# Altium PCB Side.PcbDoc
Units mm, origin at the board's own origin, x right, y up, seen from the top; angles counter-clockwise.
Board outline 51.4 x 115 mm, 2 copper layers (Top Layer, Bottom Layer); 88 components, 69 nets, 305 pads, 423 vias.
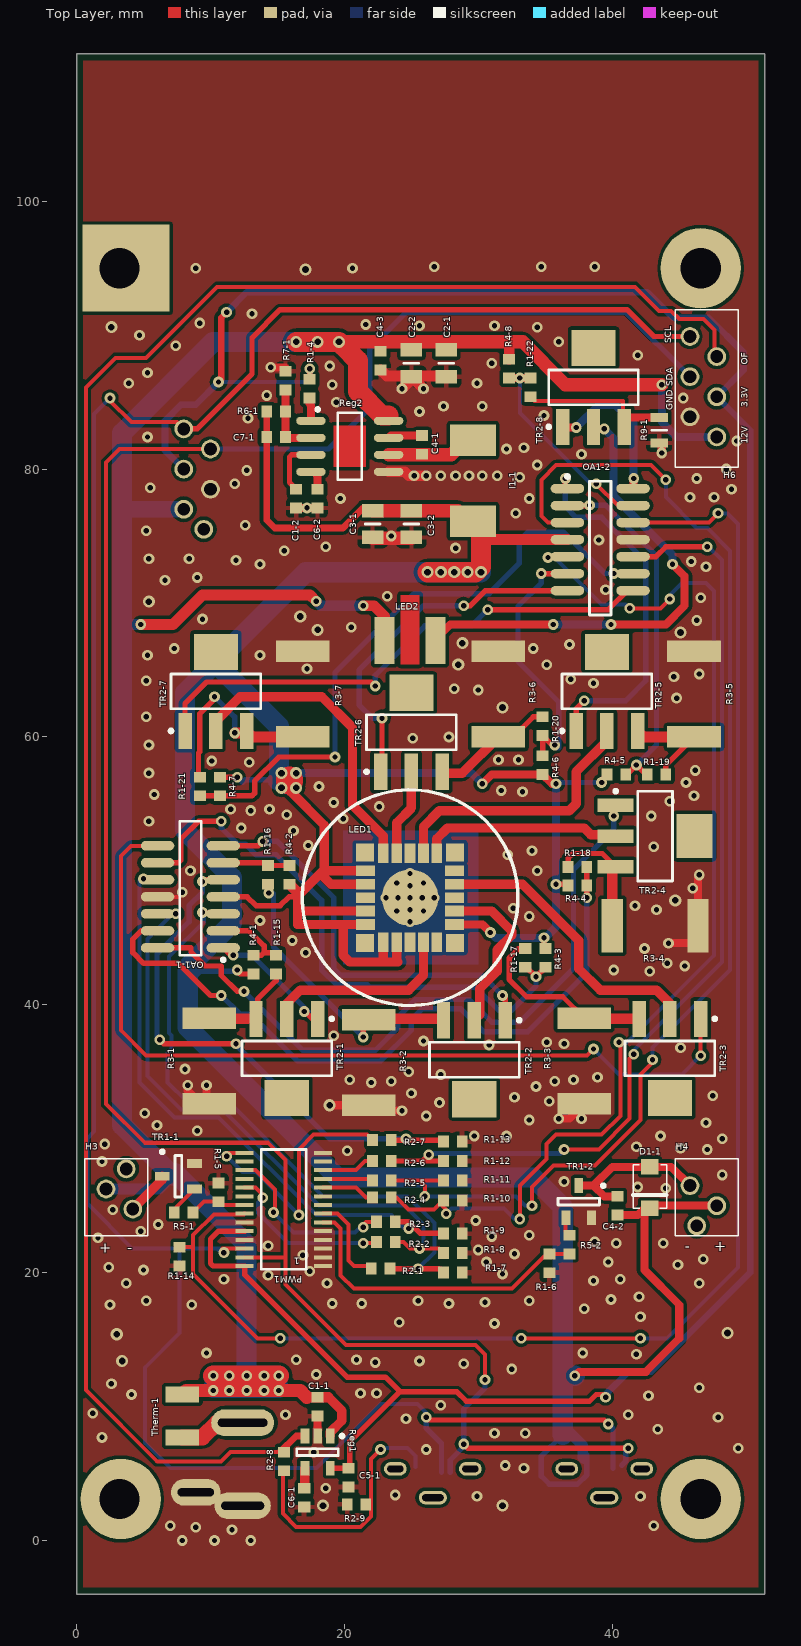
[diagram p0: Top Layer view]
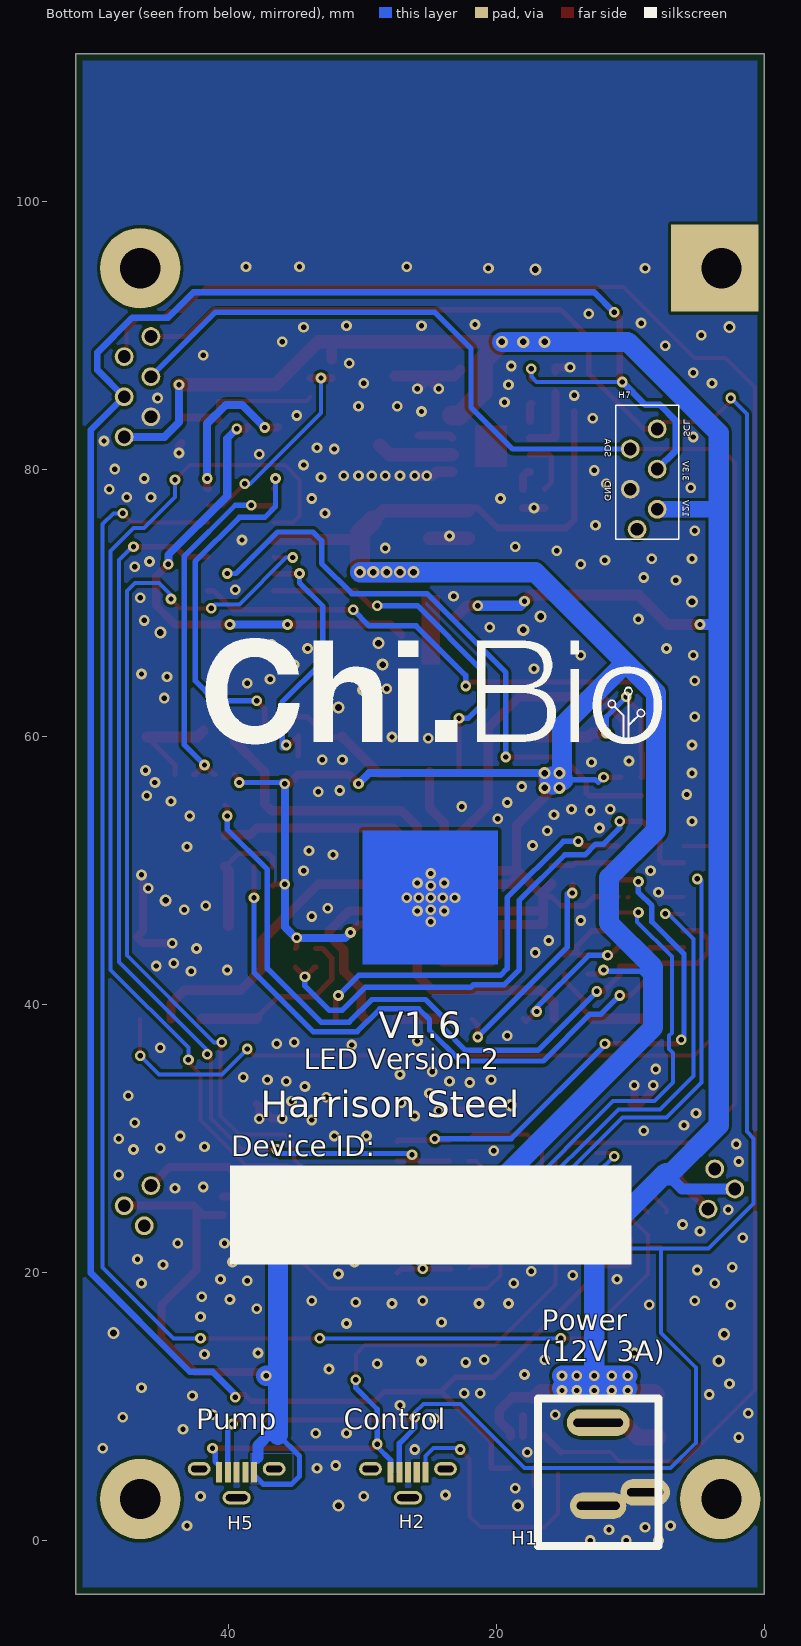
[diagram p1: Bottom Layer view, seen from below]

## Layer stack, top to bottom
Top Solder: solder mask 0.0102, Solder Resist, Dk 3.5
Top Layer: signal copper 0.0356
Dielectric 1: dielectric 0.32, FR-4, Dk 4.8
Bottom Layer: signal copper 0.0356
Bottom Solder: solder mask 0.0102, Solder Resist, Dk 3.5

## Board outline
0,-4 51.4,-4 51.4,111 0,111

## Design rules (kind name [scope] priority, off if disabled: settings)
BoardOutlineClearance [All] p1: gap=0.5 ignorepadtopadclearanceinfootprint=FALSE
Clearance [All] p1: gap=0.25 ignorepadtopadclearanceinfootprint=FALSE
HoleSize [All] p1: absolutevalues=TRUE maxlimit=50 minlimit=0.025 maxpercent=80.000 minpercent=20.000
MinimumSolderMaskSliver [All] p1: minsoldermaskwidth=0.1
PlaneConnect [All] p1: planeconnectstyle=Direct reliefexpansion=0.508 reliefentries=4 reliefconductorwidth=0.254 reliefairgap=0.254
PolygonConnect PolygonConnect_1 [All vs HasFootprint('1608[0603]')] p1: thpad.connectstyle=Relief thpad.reliefconductorwidth=0.35 thpad.reliefentries=4 thpad.polygonreliefangle="90 Angle" thpad.airgapwidth=0.3 smdpad.connectstyle=Relief smdpad.reliefconductorwidth=0.35 smdpad.reliefentries=4 smdpad.polygonreliefangle="90 Angle" smdpad.airgapwidth=0.3 via.connectstyle=Direct via.reliefconductorwidth=0.35 via.reliefentries=4 via.polygonreliefangle="90 Angle" via.airgapwidth=0.3
PolygonConnect PolygonConnect_3 [All vs HasFootprint('0805')] p2: connectstyle=Relief reliefconductorwidth=0.35 reliefentries=4 polygonreliefangle="90 Angle" airgapwidth=0.3
PolygonConnect PolygonConnect_2 [All vs HasFootprint('0805Large')] p3: connectstyle=Relief reliefconductorwidth=0.35 reliefentries=4 polygonreliefangle="90 Angle" airgapwidth=0.3
PolygonConnect [All] p4: connectstyle=Direct reliefconductorwidth=0.254 reliefentries=4 polygonreliefangle="90 Angle" airgapwidth=0.254
RoutingVias [All] p1: holewidth=0.4 width=0.8 viastyle="Through Hole" minholewidth=0.4 minwidth=0.8 maxholewidth=1.5 maxwidth=2
SilkToSilkClearance [All] p1: silktosilkclearance=0
SilkToSolderMaskClearance [IsPad] p1: minsilkscreentomaskgap=0 clearancetoexposedcopper=TRUE
SolderMaskExpansion [All] p1: expansion=0.102
Width [All] p1: maxlimit=2 minlimit=0.254 preferedwidth=0.254 minimp=50.000000 maximp=50.000000 favimp=50.000000
25 further rules are at their usual default settings.

## Components (designator, comment, footprint, x,y, rotation, side; value= is the part's Value field where it differs from the comment)
C1-1 "1 uF" 1608[0603] 18,10 r270 top
C1-2 "1 uF" 1608[0603] 16.4,77.8 r270 top
C2-1 "10 uF" 0805Large 27.6,87.9 r90 top
C2-2 "10 uF" 0805Large 25,87.9 r90 top
C3-1 "22 uF" 0805Large 22.1,75.9 r90 top
C3-2 "22 uF" 0805Large 25,75.9 r90 top
C4-1 "0.1 uF" 1608[0603] 25.8,81.8 r90 top
C4-2 "0.1 uF" 1608[0603] 40.4,25 r90 top
C4-3 "0.1 uF" 1608[0603] 22.7,88.1 r270 top
C5-1 "4.7uF" 1608[0603] 20.3,4.7 r270 top
C6-1 "0.01uF" 1608[0603] 17,3.2 r90 top
C6-2 "0.01uF" 1608[0603] 18,77.8 r270 top
C7-1 "22pF" 1608[0603] 14.9,82.4 r180 top
D1-1 "D1" "SOD 123" 42.8,24.8 r90 top
H1 "Power (12V 3A)" PowerJack1 12.4,3.6 r180 bottom
H2 "Control" "Micro USB" 26.6,5.35 r180 bottom
H3 "Heat" InterCon2 3.7,27.748 r270 top
H4 "Stir" InterCon2 46.3,23.5 r90 top
H5 "Pump" "Micro USB" 39.4,5.35 r180 bottom
H6 "Measurement" "Inter Connect 6 - reduced" 46.3,80.9 r90 top
H7 "Expansion" "Inter Connect 5" 9.5,75.5 r90 bottom
I1-1 "3.3uH" INDUCTOR2 29.6,81.9 r270 top
LED1 "LEDEngin_V2" LEDENGIN 24.9,48 r0 top
LED2 "LED UV" "UV LED" 24.9,67.2 r0 top
OA1-1 "OpAmp 4Way" SOIC14_M 8.5,48.7 r180 top
OA1-2 "OpAmp 4Way" SOIC14_M 39.1,74.1 r0 top
PWM1 "PWM28" TSSOP-28 18.4,20.5 r180 top
R1-4 "10k" 1608[0603] 17.4,86 r270 top
R1-5 "10k" 1608[0603] 10.6,26 r270 top
R1-6 "10k" 1608[0603] 35.3,20.7 r90 top
R1-7 "10k" 1608[0603] 28.1,20 r180 top
R1-8 "10k" 1608[0603] 28.1,21.467 r180 top
R1-9 "10k" 1608[0603] 28.1,22.933 r180 top
R1-10 "10k" 1608[0603] 28.1,25.4 r180 top
R1-11 "10k" 1608[0603] 28.1,26.867 r180 top
R1-12 "10k" 1608[0603] 28.1,28.333 r180 top
R1-13 "10k" 1608[0603] 28.1,29.8 r180 top
R1-14 "10k" 1608[0603] 7.7,21.2 r90 top
R1-15 "10k" 1608[0603] 14.9,43 r270 top
R1-16 "10k" 1608[0603] 14.3,49.7 r270 top
R1-17 "10k" 1608[0603] 33.5,43.5 r90 top
R1-18 "10k" 1608[0603] 37.4,50.3 r180 top
R1-19 "10k" 1608[0603] 43.3,57.2 r0 top
R1-20 "10k" 1608[0603] 34.8,60.8 r90 top
R1-21 "10k" 1608[0603] 9.2,56.3 r90 top
R1-22 "10k" 1608[0603] 33.9,86.1 r90 top
R2-1 "38.3k" 1608[0603] 22.7,20.3 r180 top
R2-2 "38.3k" 1608[0603] 23.1,22.3 r180 top
R2-3 "38.3k" 1608[0603] 23.1,23.8 r180 top
R2-4 "38.3k" 1608[0603] 22.8,25.6 r180 top
R2-5 "38.3k" 1608[0603] 22.8,26.867 r180 top
R2-6 "38.3k" 1608[0603] 22.8,28.333 r180 top
R2-7 "38.3k" 1608[0603] 22.8,29.9 r180 top
R2-8 "38.3k" 1608[0603] 15.5,5.9 r90 top
R2-9 "38.3k" 1608[0603] 20.9,2.7 r0 top
R3-1 "1" 2512 9.9,35.8 r270 top
R3-2 "1" 2512 21.8,35.7 r270 top
R3-3 "1" 2512 37.9,35.8 r270 top
R3-4 "1" 2512 43.2,45.9 r0 top
R3-5 "1" 2512 46.098,63.2 r90 top
R3-6 "1" 2512 31.498,63.2 r90 top
R3-7 "1" 2512 16.898,63.2 r90 top
R4-1 "1M" 1608[0603] 13.2,43 r90 top
R4-2 "1M" 1608[0603] 15.9,49.7 r90 top
R4-3 "1M" 1608[0603] 35,43.5 r270 top
R4-4 "1M" 1608[0603] 37.4,48.9 r0 top
R4-5 "1M" 1608[0603] 40.3,57.2 r0 top
R4-6 "1M" 1608[0603] 34.8,57.9 r90 top
R4-7 "1M" 1608[0603] 10.7,56.3 r270 top
R4-8 "1M" 1608[0603] 32.3,87.5 r270 top
R5-1 "4.99" 1608[0603] 8,24.5 r180 top
R5-2 "4.99" 1608[0603] 36.8,22.1 r90 top
R6-1 "152k" 1608[0603] 14.9,84.3 r0 top
R7-1 "22.1k" 1608[0603] 15.6,86.6 r270 top
R9-1 "40.2" 0805 43.5,82.9 r90 top
Reg1 "3.3V Regulator" SOT23-5 18,6.6 r270 top
Reg2 "6V Regulator" "8-SOIC V3" 20.4,81.7 r0 top
Therm-1 "10" 1206 7.9,7.7 r90 top
TR1-1 "MOSFET" SOT23-3 7.6,27.2 r0 top
TR1-2 "MOSFET" SOT23-3 37.5,25.3 r270 top
TR2-1 "TransistorPower2" SOT223_M 15.7,36 r270 top
TR2-2 "TransistorPower2" SOT223_M 29.7,35.9 r270 top
TR2-3 "TransistorPower2" SOT223_M 44.3,36 r270 top
TR2-4 "TransistorPower2" SOT223_M 43.2,52.6 r0 top
TR2-5 "TransistorPower2" SOT223_M 39.6,63.4 r90 top
TR2-6 "TransistorPower2" SOT223_M 25,60.35 r90 top
TR2-7 "TransistorPower2" SOT223_M 10.4,63.4 r90 top
TR2-8 "TransistorPower2" SOT223_M 38.6,86.1 r90 top

## Footprints (in the part's own frame and the unit in brackets; to place one, negate y for a bottom-side part, rotate by r counter-clockwise, add the part's x,y. Pads: shape width x height; smd on the part's side, far side on the other; paste and mask are expansions set on the pad)
"8-SOIC V3" [mm] "SOIC, 8-Leads, Body 4.9x3.9mm, Pitch 1.27mm, IPC Medium Density"
  oval 2.2x0.6 smd: 1(-2.9,1.905) 2(-2.9,0.635) 3(-2.9,-0.635) 4(-2.9,-1.905) 5(2.9,-1.905) 6(2.9,-0.635) 7(2.9,0.635) 8(2.9,1.905)
  Top Layer region: -1.2,-1.55 1.2,-1.55 1.2,1.55 -1.2,1.55
  silkscreen extent -2.52,-2.5 0.9,2.88, body extent -2,-2.5 2,2.5, height 1.75
0805 [mm] "Chip Resistor, Body 2.0x1.2mm, IPC High Density"
  rect 0.7x1.3 smd: 1(-0.95,0) 2(0.95,0)
  silkscreen extent 0,-0.55 0,0.55, body extent -1.07,-0.7 1.07,0.7, height 0.7
0805Large [mm] "Chip Resistor, Body 2.0x1.2mm, IPC High Density"
  rect 1x1.6 smd: 1(-1,0) 2(1,0)
  silkscreen extent 0,-0.55 0,0.55, body extent -1.07,-0.7 1.07,0.7, height 0.7
1206 [mm]
  rect 1.2x2.5 smd: 1(0,0) 2(3.2,0)
1608[0603] [mm] "Chip Capacitor, Body 1.6x0.8mm, IPC High Density"
  rect 0.8x0.9 smd: 1(-0.7,0) 2(0.7,0)
  body extent -0.87,-0.48 0.87,0.48, height 1.3
2512 [mm] "Chip Inductor, Body 2.0x1.2mm, IPC High Density"
  rect 1.6x4 smd: 1(3.2,0) 2(-3.2,0)
  body extent -1.1,-0.7 1.1,0.7, height 0.55
INDUCTOR2 [mm] "Chip Inductor, Body 2.0x1.2mm, IPC High Density"
  rect 2.35x3.4 smd: 1(-0.25,0) 2(5.8,0)
"Inter Connect 5" [mm]
  round 1.4 hole 0.95: 0(0,0) 1(1.5,-1.5) 2(3,0.5) 3(4.5,-1.5) 4(6,0.5) 5(7.5,-1.5)
  silkscreen extent -0.75,-3.1 9.25,1.6
"Inter Connect 6 - reduced" [mm]
  round 1.4 hole 0.95: 1(1.5,-1.5) 2(3,0.5) 3(4.5,-1.5) 4(6,0.5) 5(7.5,-1.5) 6(9,0.5)
  silkscreen extent -0.75,-3.1 11,1.6
InterCon2 [mm]
  round 1.4 hole 0.95: 0(0,0) 1(1.5,-1.5) 2(3,0.5)
  silkscreen extent -0.75,-3.1 5,1.6
LEDENGIN [mm]
  rect 1.35x1.35 smd: 1(-3.37,3.37) 7(-3.37,-3.37) 13(3.37,-3.37) 19(3.37,3.37)
  rect 1.44x0.8 smd: 2(-3.325,2) 3(-3.325,1) 4(-3.325,0) 5(-3.325,-1) 6(-3.325,-2) 14(3.325,-2) 15(3.325,-1) 16(3.325,0) 17(3.325,1) 18(3.325,2)
  rect 0.8x1.44 smd: 8(-2,-3.325) 9(-1,-3.325) 10(0,-3.325) 11(1,-3.325) 12(2,-3.325) 20(2,3.325) 21(1,3.325) 22(0,3.325) 23(-1,3.325) 24(-2,3.325)
  round 4.22 smd: 25(0,0)
  round 0.2 on Top Overlay: 25_1(-4.6,3)
"Micro USB" [mm]
  oval 2.1x1 hole 0.5 slot 1.6 at 0 deg: 0(0,-2.15)
  oval 1.7x1 hole 0.5 slot 1.2 at 0 deg: 0_1(2.8,0) 0_2(-2.8,0)
  rect 0.45x1.5 smd: 1(-1.3,-0.25) 2(-0.65,-0.25) 3(0,-0.25) 4(0.65,-0.25) 5(1.3,-0.25)
PowerJack1 [mm]
  oval 4.7x2 hole 0.6 slot 3.7 at 0 deg: 1(0,5.2)
  oval 4.2x2 hole 0.6 slot 3.2 at 0 deg: 2(0,-1)
  oval 3.7x2 hole 0.6 slot 2.7 at 0 deg: 3(3.5,0)
  silkscreen extent -4.5,-4 4.5,7
"SOD 123" [mm]
  rect 1.15x1.3 smd: 1(0,0) 2(3.1,0)
  silkscreen extent 0,-1.25 3.25,1.25
SOIC14_M [mm] "SOIC, 16-Leads, Body 9.9x3.9mm, Pitch 1.27mm, IPC Low Density"
  oval 2.5x0.7 smd: 1(-2.45,4.445) 2(-2.45,3.175) 3(-2.45,1.905) 4(-2.45,0.635) 5(-2.45,-0.635) 6(-2.45,-1.905) 7(-2.45,-3.175) 8(2.45,-3.175) 9(2.45,-1.905) 10(2.45,-0.635) 11(2.45,0.635) 12(2.45,1.905) 13(2.45,3.175) 14(2.45,4.445)
  silkscreen extent -2.58,-5 0.8,5.47, body extent -2,-5 2,5, height 1.91
SOT23-3 [mm] "SOT23, 6-Leads, Body 2.9x1.6mm, Pitch 0.95mm, Lead Span 2.7mm, IPC Medium Density"
  rect 1.1x0.65 smd: 1(1.2,-0.95) 2(1.2,0.95) 3(-1.2,0)
  silkscreen extent -1.32,-1.55 0.25,1.95, body extent -0.9,-1.55 0.9,1.55, height 1.45
SOT23-5 [mm] "SOT23, 6-Leads, Body 2.9x1.6mm, Pitch 0.95mm, Lead Span 2.7mm, IPC Medium Density"
  rect 1.1x0.65 smd: 1(-1.2,0.95) 2(-1.2,0) 3(-1.2,-0.95) 4(1.2,-0.95) 5(1.2,0.95)
  silkscreen extent -1.32,-1.55 0.25,1.95, body extent -0.9,-1.55 0.9,1.55, height 1.45
SOT223_M [mm] "SOT223, 4-Leads, Body 6.5x3.5mm, Pitch 2.3mm, Lead Span 7mm, IPC Low Density"
  rect 2.7x1 smd: 1(-2.95,2.3) 2(-2.95,0) 3(-2.95,-2.3)
  rect 2.7x3.3 smd: 4(2.95,0)
  silkscreen extent -3.07,-3.35 1.3,3.48, body extent -1.85,-3.35 1.85,3.35, height 1.7
TSSOP-28 [mm]
  rect 1.35x0.3 smd: 1(0,0) 2(0,-0.65) 3(0,-1.3) 4(0,-1.95) 5(0,-2.6) 6(0,-3.25) 7(0,-3.9) 8(0,-4.55) 9(0,-5.2) 10(0,-5.85) 11(0,-6.5) 12(0,-7.15) 13(0,-7.8) 14(0,-8.45) 15(5.85,-8.45) 16(5.85,-7.8) 17(5.85,-7.15) 18(5.85,-6.5) 19(5.85,-5.85) 20(5.85,-5.2) 21(5.85,-4.55) 22(5.85,-3.9) 23(5.85,-3.25) 24(5.85,-2.6) 25(5.85,-1.95) 26(5.85,-1.3) 27(5.85,-0.65) 28(5.85,0)
  silkscreen extent 1.25,-8.7 4.6,0.25
"UV LED" [mm]
  rect 1.5x3.5 smd: 1(1.9,0) 2(-1.9,0)
  round 0.3 on Top Overlay: 3(-1.85,2.15)

## Part data
C1-1 C1-2 C4-1 C4-2 C4-3 C5-1 C6-1 C6-2: library part Cap, "Capacitor", FP="0603 (1608 Metric)"
  C1-1 C1-2: Digikey P/N=1276-1019-1-ND
  C4-1 C4-2 C4-3: Digikey P/N=311-1341-1-ND
  C5-1: Digikey P/N=1276-1044-1-ND
  C6-1 C6-2: Digikey P/N=445-5662-1-ND
C2-1 C2-2 C3-1 C3-2: library part "Cap 0805", "Capacitor", FP="0805 (2012 Metric)"
  C2-1 C2-2: Digikey P/N=587-1295-1-ND
  C3-1 C3-2: Digikey P/N=1276-6780-1-ND
C7-1: library part Cap, "Capacitor C0G,NP0", Digikey P/N=311-1755-1-ND, FP="0603 (1608 Metric)"
D1-1: library part Diode, "Diode", DigiKey=https://www.digikey.co.uk/products/en?keywords=1655-1928-1-ND, Digikey P/N=1655-1928-1-ND, FP=SOD-123
H1: library part PowerJack1, "Power Connector", DigiKey=https://www.digikey.co.uk/product-detail/en/cui-inc/PJ-044AH/CP-044AH-ND/1644569, Digikey P/N=CP-044AH-ND, FP="PWR Jack"
H2 H5: library part MicroUSB, "MicroUSB Connector", Digikey P/N=WM10134CT-ND, DK=https://www.digikey.co.uk/product-detail/en/molex-llc/1051330001/WM9734CT-ND/4037910, FP="MicroUSB Female"
H3 H4: library part "Interconnect 2", "2 Position Connector", Digikey P/N=A98681-ND, DK=https://www.digikey.co.uk/product-detail/en/te-connectivity-amp-connectors/292207-2/A98681-ND/1855351, FP="Mini CT 2POS"
H6: library part "Interconnect 6", "6 Wire", Digikey P/N=A100196-ND, DK=https://www.digikey.co.uk/product-detail/en/te-connectivity-amp-connectors/292207-6/A98685-ND/1855355, FP="Connecting Wire"
H7: library part "Interconnect 5", "5 Position Connector", Digikey P/N=A98684-ND, DK=https://www.digikey.co.uk/product-detail/en/te-connectivity-amp-connectors/292207-5/A98684-ND/1855354, FP="Mini CT 5POS"
I1-1: library part Inductor2, "Inductor", Digikey P/N=445-4119-1-ND, DK=https://www.digikey.co.uk/product-detail/en/tdk-corporation/SPM6530T-3R3M/445-4119-1-ND/1993657, FP="Wirewound Inductor"
OA1-1 OA1-2: "OpAmp", Digikey P/N=AD8534ARZ-REELCT-ND, DK=https://www.digikey.co.uk/product-detail/en/analog-devices-inc/AD8534ARZ-REEL/AD8534ARZ-REELCT-ND/3771270, FP=14-SOIC
PWM1: "PWM", Digikey P/N=568-11925-1-ND, DK=https://www.digikey.co.uk/product-detail/en/nxp-usa-inc/PCA9685PW118/568-11925-1-ND/5221902, FP=28-TSSOP
R1-4 R1-5 R1-6 R1-7 R1-8 R1-9 R1-10 R1-11 R1-12 R1-13 R1-14 R1-15 R1-16 R1-17 R1-18 R1-19 R1-20 R1-21 R1-22 R2-1 R2-2 R2-3 R2-4 R2-5 R2-6 R2-7 R2-8 R2-9 R4-1 R4-2 R4-3 R4-4 R4-5 R4-6 R4-7 R4-8 R5-1 R5-2 R6-1 R7-1: library part Res1, "Resistor", FP="0603 (1608 Metric)"
  R1-4 R1-5 R1-6 R1-7 R1-8 R1-9 R1-10 R1-11 R1-12 R1-13 R1-14 R1-15 R1-16 R1-17 R1-18 R1-19 R1-20 R1-21 R1-22: Digikey P/N=311-10.0KHRCT-ND
  R2-1 R2-2 R2-3 R2-4 R2-5 R2-6 R2-7 R2-8 R2-9: Digikey P/N=311-38.3KHRCT-ND
  R4-1 R4-2 R4-3 R4-4 R4-5 R4-6 R4-7 R4-8: Digikey P/N=RMCF0603FG1M00CT-ND
  R5-1 R5-2: Digikey P/N=311-4.99HRCT-ND
  R6-1: DigiKey=https://www.digikey.co.uk/product-detail/en/yageo/RT0603DRE07152KL/311-2096-1-ND/6128515, Digikey P/N=311-2096-1-ND
  R7-1: Digikey P/N=311-2486-1-ND
R3-1 R3-2 R3-3 R3-4 R3-5 R3-6 R3-7 R9-1: library part Res2, "Resistor"
  R3-1 R3-2 R3-3 R3-4 R3-5 R3-6 R3-7: Digikey P/N=A109718CT-ND, FP="2512 (6432 Metric)"
  R9-1: DigiKey=https://www.digikey.co.uk/product-detail/en/stackpole-electronics-inc/RMCF2512FT49R9/RMCF2512FT49R9CT-ND/6052990, Digikey P/N=P16072CT-ND, FP="0805 (2012 Metric)"
Reg1: library part "4V Regulator", DigiKey=https://www.digikey.co.uk/product-detail/en/texas-instruments/LP2985-33DBVR/296-18476-1-ND/809911, Digikey P/N=296-18476-1-ND, FP=SOT-23-5
Reg2: library part "VRegulator V2", DigiKey=https://www.digikey.co.uk/product-detail/en/texas-instruments/TPS54427DDAR/296-30033-1-ND/2795678, Digikey P/N=296-30033-1-ND, FP=8-SOIC
Therm-1: library part Res1, "Thermistor", DigiKey=https://www.digikey.com/en/products/detail/NC20KC0100KBA/478-NC20KC0100KBACT-ND/12760761, Digikey P/N=478-NC20KC0100KBACT-ND, FP="1206 (3216 Metric)"
TR1-1 TR1-2: library part "Heater MOSFET", "Transistor", DigiKey=https://www.digikey.co.uk/product-detail/en/alpha-omega-semiconductor-inc/AO3420/785-1014-1-ND/1855956, Digikey P/N=785-1014-1-ND, FP=SOT-23-3
TR2-1 TR2-2 TR2-3 TR2-4 TR2-5 TR2-6 TR2-7 TR2-8: "Transistor", DigiKey=https://www.digikey.co.uk/product-detail/en/diodes-incorporated/ZXTN25100DGTA/ZXTN25100DGCT-ND/1873984, Digikey P/N=ZXTN25100DGCT-ND, FP=SOT-223
LED1: Digikey P/N=LZ7-04M2PD-0000_G2
LED2: DigiKey=https://www.digikey.co.uk/products/en?keywords=RVXR-280-SM-073105, Digikey P/N=1807-1023-2-ND, FP="XR SMD"

## Free pads (board coordinates)
  round 6 hole 3 copper offset 0.1,0: 3(3.2,3.1)
  rect 6.5x6.5 hole 3 copper offset 0.5,0: 3(3.2,95)
  round 6 hole 3: 3(46.6,3.1) 3(46.6,95)

## Via types
v1: diameter 0.8, hole 0.4, Top Layer to Bottom Layer, tented both sides, 394 vias
v2: diameter 0.9, hole 0.5, Top Layer to Bottom Layer, tented both sides, 28 vias
v3: diameter 0.8, hole 0.4, Top Layer to Bottom Layer, 1 vias

## Nets (pads, with @x,y where several pads share a name; then routed paths per layer and width w, separated by ;. In a path a pad name is that pad's centre, name@x,y a point inside that pad or via, vN(x,y) a via of type N, cw(c..) or ccw(c..) an arc to the next point about the centre after c; other vN are vias at no path point)
3.3V: C5-1.1 H6.3 H7.3 PWM1.24 PWM1.28 R1-4.1 Reg1.5 | length 197.8
  Top Layer w0.4: PWM1.24 10.6,23.1 10,22.5 10,20.7 10.2,20.5 PWM1.28 12.55,19.851 20.201,12.2 23.068,12.2 24.134,11.134 ; R1-4.1 v1(17.4,87.5) ; Reg1.5 C5-1.1 20.4,5.4 20.4,6.8 20.4,7.4 24.1,11.1 28.4,11.1 29.1,10.4 38.3,10.4 38.8,10.9 39.5,10.9 v1(39.5,10.7)
  Top Layer w0.5: v1(10.6,86.5) 10.8,86.7 10.8,91.3 v1(11.2,91.7)
  Bottom Layer w0.3: v1(10.6,86.5) 17,86.5 17.4,86.9 v1(17.4,87.5)
  Bottom Layer w0.4: v1(39.5,10.7) 39.3,10.7 v1@39.5,10.9
  Bottom Layer w0.5: H7.3 6.6,81.4 6.6,83.6 7.8,84.8 8.9,84.8 v1(10.6,86.5) ; v1(11.2,91.7) 12.7,93.2 42.621,93.2 44.521,91.3 47.2,91.3 49.8,88.7 49.8,87.4 H6.3 50.3,82.9 50.3,20 42.9,12.6 41.2,12.6 v1@39.5,10.9
6V: C3-1.2 C3-2.2 C4-2.1 C7-1.2 D1-1.1 H4.1 H5.5 I1-1.2 LED1.2 LED1.3 LED1.5 LED1.6 LED1.8 LED1.9 LED1.14 OA1-1.4 OA1-2.4 R4-1.1 R4-2.1 R4-3.1 R4-4.1 R4-5.1 R4-6.1 R4-7.1 R6-1.1 | length 295.4
  Top Layer w0.3: OA1-1.4@10.15,48.065 OA1-1.4@10.215,48
  Top Layer w0.4: R4-7.1 v1(12,57) ; OA1-1.4 12.735,48.065 13.4,47.4 15.2,47.4 15.865,48.065 16.465,48.065 ; v1(12,42.6) 12,42.5 12.2,42.3 R4-1.1 ; 16.465,48.435 16.465,48.065 ; 16.5,48.1 16.465,48.065 ; v1(34.9,45) 34.9,44.3 R4-3.1 ; v1@35.5,56.5 v1(35.8,56.5) ; v1(35.8,49) 36.6,49 R4-4.1 ; v1(39.2,56.6) 39.1,56.7 R4-5.1
  Top Layer w0.5: R6-1.1 C7-1.2 14.2,76.2 14.8,75.6 19.9,75.6 21.4,77.1 C3-1.2@21.8,77.1
  Top Layer w0.6: LED1.14 30.3,46 v3(30.9,45.4) ; v1(30.3,56.5) 31,57.2 R4-6.1 v1@35.5,56.5 ; v1(37.2,12.3) 37.5,12.6 42.5,12.6 45,15.1 45,17.6 42.4,20.2 D1-1.1@42.4,24.8 ; C4-2.1 41.9,24.3 D1-1.1@42.4,24.8 ; H4.1 42.6,25 D1-1.1@42.4,24.8
  Top Layer w0.7: 16,55.9 18.5,53.4 18.5,50.1 ; LED1.6 19.9,46 ; LED1.5 16.6,47 16.5,47.1 ; LED1.3 19,49 18.2,49.8 ; LED1.2 18.6,50 18.5,50.1 ; LED1.8 22.9,43.3 23,43.2 ; LED1.9 23.9,43.3 24,43.2 23,43.2 ; 16.5,47.1 16.5,46 19.9,46 ; 16.5,47.1 16.5,48.1 18.2,49.8 ; 18.2,49.8 18.5,50.1 ; 19.9,46 19.9,43.7 20.4,43.2 23,43.2
  Top Layer w0.8: R4-2.1 16.465,48.435 ; I1-1.2@30.2,75.2 30.665,74.735 OA1-2.4
  Top Layer w1: C3-1.2 C3-2.2 28.45,76.9 I1-1.2@29,76.35
  Top Layer w1.5: v2(26.2,72.3) v2(27.2,72.3) v2(28.2,72.3) v2(29.2,72.3) 29.8,72.3 30.2,72.7 30.2,75.2 I1-1.2@29.25,76.15
  Top Layer w2: 15.9,56.7 15.9,56.8
  Bottom Layer w0.4: 8.3,41.6 9.2,42.5 11.9,42.5 v1(12,42.6) ; v1(12,57) 12.4,56.6 12.6,56.8 15,56.8 ; v1(35.8,56.5) 36,56.7 36.1,56.6 v1(39.2,56.6) ; 36.3,7.9 34.7,6.3 34.7,4.8 35.3,4.2 37.4,4.2 38.1,4.9 38.1,6.4 37.8,6.7
  Bottom Layer w0.6: v2(16.4,57.3) 29.5,57.3 v1(30.3,56.5) ; v3(30.9,45.4) 31.3,45 v1(34.9,45) ; v1@34.9,44.9 35.8,45.8 v1(35.8,49) v1(35.8,56.5)
  Bottom Layer w0.8: 36.85,8.05 37.8,7.1 37.8,6.7 37.8,6.2 37.9,6.1
  Bottom Layer w1.5: 15,56.8 15.1,56.7 15.1,60.8 10.35,65.55 ; v2(30.2,72.3) v2(29.2,72.3) v2(28.2,72.3) v2(27.2,72.3) v2(26.2,72.3) 17.1,72.3 10.35,65.55 ; 36.3,7.9 36.3,12.3 ; v1(37.2,12.3) 36.3,12.3 ; 10.35,65.55 8.1,63.3 8.1,53 11.6,49.5 11.6,46.1 8.3,42.8 8.3,41.6 8.3,38.3 19.5,27.1 34.1,27.1 36.3,24.9 36.3,12.3
  Bottom Layer w2: 15.8,56.7 15.8,56.8
  other v2: 15.3,56.2 16.4,56.2 15.3,57.3
12VRaw: C1-1.1 C2-1.2 C2-2.2 C4-3.1 H3.1 H6.1 H7.1 LED2.2 R4-8.1 Reg1.1 Reg2.8 Therm-1.2 | length 199.9
  Top Layer w0.7: 18.8,10.7 19.8,9.7 19.8,8.95 18.95,8.1 Reg1.1
  Top Layer w0.8: v1(4.8,68.4) 7.2,68.4 9.4,70.6 11.1,70.6 ; 11.2,70.6 17.428,70.6 v1(17.9,70.128) ; 17.2,10.7 C1-1.1 18.8,10.7 ; v1(21.4,69.8) 22.2,69.8 23,69 ; R4-8.1 32.3,89.5
  Top Layer w1: Therm-1.2 8.2,11.2 v1(10.2,11.2) v1(11.4,11.2) v1(12.7,11.2) v1(14,11.2) v1(15.1,11.2) 16.7,11.2 17.2,10.7 ; v2@19.9,89.2 v2(19.6,89.5) 32.3,89.5 33.3,89.5 36.5,86.3 v1(43.7,86.3)
  Top Layer w1.5: v1(10.2,12.3) v1(11.4,12.3) v1(12.7,12.3) v1(14,12.3) v1(15.1,12.3) ; v2(16.4,89.5) v2(18,89.5) v2(19.6,89.5) ; v2@19.9,89.2 21,88.1 21,85.8 22.8,84 23.3,84
  Bottom Layer w0.6: v1(43.7,86.3) 43.7,83.5 44.8,82.4 H6.1
  Bottom Layer w0.8: H3.1 6.148,26.248 7.15,27.25 ; 3.5,68.4 v1(4.8,68.4) ; 7.2,27.3 7.15,27.25 ; 7.35,27.45 7.3,27.4 7.15,27.25 ; v1(17.9,70.128) 18.228,69.8 v1(21.4,69.8)
  Bottom Layer w1.2: 3.4,76.8 3.6,77 H7.1
  Bottom Layer w1.5: 7.15,27.25 3.4,31 3.4,76.8 3.4,82.7 10.2,89.5 v2(16.4,89.5) v2(18,89.5) v2(19.6,89.5) ; 7.35,27.45 12.7,22.1 v1(12.7,12.3) ; v1@10.2,11.4 v1@12.7,11.4 ; v1(10.2,12.3) v1(11.4,12.3) v1(12.7,12.3) ; v1@15.1,11.4 v1@12.7,11.4 ; v1(15.1,12.3) v1(14,12.3) v1(12.7,12.3) ; v1@12.7,11.4 v1(12.7,12.3)
Blue: LED1.23 TR2-6.2 | length 6.5
  Top Layer w0.7: LED1.23 23.9,53.6 25,54.7 TR2-6.2
Blue0: PWM1.10 R2-4.2 | length 4
  Top Layer w0.3: PWM1.10 20.85,26.35 21.6,25.6 R2-4.2
Blue1: OA1-2.5 R1-10.2 R2-4.1 | length 83.6
  Top Layer w0.3: R2-4.1 23.9,25.6 24.8,24.7 26.7,24.7 R1-10.2@27.15,25.15 ; R1-10.2 R1-10.2@27.15,25.15 ; v1(27.6,24.4) 27.6,24.7 R1-10.2@27.15,25.15 ; v1(33.1,24) 33.1,26.5 35.1,28.5 35.1,29.6 35.8,30.3 39.2,30.3 40.6,31.7 40.6,37.1 v1(40.5,37.2) ; v1(35.2,73.4) 36.385,73.4 36.485,73.3 OA1-2.5 ; v1(41.3,69.6) 43.6,69.6 v1(44.3,70.3)
  Bottom Layer w0.3: v1(27.6,24.4) 28,24.8 31.9,24.8 32.7,24 v1(33.1,24) ; v1(35.2,73.4) 35.7,73.4 39.2,69.9 41,69.9 v1(41.3,69.6) ; v1(40.5,37.2) 41.1,37.2 47.6,43.7 47.6,70.9 47,71.5 45.2,71.5 44.3,70.6 v1(44.3,70.3)
Cyan: LED1.11 TR2-1.2 | length 14.7
  Top Layer w0.7: TR2-1.2 15.7,40.1 16.7,41.1 24.8,41.1 25.9,42.2 LED1.11
Cyan0: PWM1.7 R2-1.2 | length 6.9
  Top Layer w0.3: PWM1.7 19.5,24.4 20.3,23.6 20.3,20.9 20.7,20.5 21.8,20.5 R2-1.2
Cyan1: OA1-1.3 R1-7.2 R2-1.1 | length 47.9
  Top Layer w0.3: v1(9.4,46.9) 10.845,46.9 OA1-1.3
  Top Layer w0.4: R2-1.1 v1(25.5,20.3) 27.1,20.3 R1-7.2
  Bottom Layer w0.3: v1(9.4,46.9) 9.5,46.8 9.5,46.2 6.9,43.6 6.9,37.9 7.1,37.7 7.1,36.7 6.8,36.4 6.8,34.2 8.2,32.8 11.3,32.8 18.4,25.7 24.7,25.7 26.708,23.692 26.708,21.508 v1(25.5,20.3)
Enable: H2.5 R2-8.1 R2-9.2 | length 19.3
  Top Layer w0.3: R2-8.1@15.4,5 15.4,2 16.4,1 21.2,1 22,1.8 22,6.1 v1(22.7,6.8)
  Bottom Layer w0.3: v1(22.7,6.8) 22.8,6.9 24.7,6.9 25.3,6.3 H2.5@25.3,5.5
GND: C1-1.2 C1-2.2 C2-1.1 C2-2.1 C3-1.1 C3-2.1 C4-3.2 C5-1.2 C6-1.1 C6-2.2 H1.2 H1.3 H2.3 H5.3 H6.2 H7.2 OA1-1.11 OA1-2.11 PWM1.1 PWM1.2 PWM1.3 PWM1.4 PWM1.5 PWM1.14 PWM1.23 PWM1.25 R1-5.1 R1-6.1 R1-7.1 R1-8.1 R1-9.1 R1-10.1 R1-11.1 R1-12.1 R1-13.1 R1-14.1 R2-9.1 R3-1.1 R3-2.1 R3-3.1 R3-4.1 R3-5.1 R3-6.1 R3-7.1 R7-1.1 R9-1.1 Reg1.2 Reg2.5 TR1-1.2 TR1-2.2 | length 41.2
  Top Layer w0.3: OA1-1.11 7.565,48.065 v1(7.9,48.4)
  Top Layer w0.6: v1(8.3,34) 8.3,33.6 R3-1.1@9.3,32.6 ; v1(9.7,34) 9.7,33 R3-1.1@9.3,32.6 ; R3-1.1 R3-1.1@9.3,32.6 ; v1(14.5,87.6) 15.6,87.6 R7-1.1 ; C1-2.2 v1(17.2,77.1) C6-2.2 ; Reg1.2 C1-1.2 ; v2(18.9,32.5) R3-2.1 22.2,32.1 v1(24.3,32.1) ; v1(36,31.5) 36.8,31.5 R3-3.1@37.7,32.4 ; v1(37.7,31.5) R3-3.1@37.7,32.4 ; R3-3.1 R3-3.1@37.7,32.4 ; R9-1.1 43.7,81.75 v1(43.7,81.2) ; v1(44.2,44.6) 46.4,44.6 46.85,45.05 46.4,45.5 R3-4.1 46.4,49.6 v1(46.5,49.7)
  Top Layer w0.8: C4-3.2 23.15,86.95 C2-1.1@27.6,86.95 ; Reg2.5 24.505,79.795 24.8,79.5 v1(25.2,79.5) v1(26.1,79.5) ; v1(24.3,86) 25,86.7 C2-2.1 v1(25.9,86)
  Top Layer w1: C3-1.1@22.1,74.85 C3-2.1@25,74.85
  other v1: 7.9,0 10.3,0 13,0 11.6,0.8 8.9,1 7,1.1 43.1,1.1 29.9,3.3 42.1,3.3 23.8,3.4 18.6,3.9 33.4,5.4 32,5.6 17.7,6.6 26.1,6.8 49.4,6.9 1.9,7.7 31.2,8 33.5,8 43.4,8.3 24.6,9.1 47.9,9.2 15.6,9.4 41.2,9.4 1.2,9.5 27.2,10.1 42.7,10.8 4.1,10.9 21.2,11 22.4,11 46.5,11.4 2.6,11.7 17.9,12.4 32.5,12.8 28.9,13.2 22.3,13.3 25.6,13.4 16.4,13.5 20.9,13.5 41.8,13.9 9.7,14 37.8,14 31.2,16.2 24.1,16.3 42.1,16.7 37.9,17.3 2.5,17.6 8.6,17.6 19.1,17.7 21.3,17.7 27.8,17.7 30.5,17.8 5.2,17.9 25.5,17.9 33.8,17.9 39.9,18 42,18.2 3.7,19.2 18.7,19.2 46.5,19.2 38.6,19.4 11,19.5 40.6,19.5 14.3,19.8 31.8,19.9 17.4,20.1 5,20.2 2.4,20.4 44.9,20.6 30.6,20.8 39.7,20.8 46.8,21 16.9,21.3 32.7,21.4 30,21.7 14.3,22 40.3,22.2 43.8,22.2 38.7,22.3 1.6,22.6 31,22.7 33.8,22.8 4.8,23.1 6.1,23.6 29.8,23.9 2.7,24.7 44,26.3 41.9,26.4 36.4,26.8 48.2,27.3 1.9,28.3 20.2,29.1 47.1,29.2 45.1,29.3 41.8,29.4 2.1,29.6 48.2,30 29.7,30.2 32.1,30.2 43.6,30.2 9,30.6 6,31 47,31.2 33.8,31.4 26.1,31.7 5.1,31.9 27.1,32.7 35.3,32.8 32.7,33.1 47.5,33.2 25,33.4 34.3,33.9 22,34.2 23.5,34.3 35.7,34.3 20.4,34.4 37.1,34.4 38.9,34.6 27.2,34.8 24.8,35 8.1,35.2 45.1,36.8 30.8,37 36.4,37.1 35.1,37.2 25.9,37.3 19.2,37.7 42.8,42.5 40.1,42.6 45.4,42.9 44.1,43.1 17.1,43.9 42.4,44.2 16.1,44.8 13.7,46.3 33.8,46.6 43.3,47.1 32.6,47.2 41.7,47.4 46,48.7 8.5,50 34.4,50 32.2,51.2 34,51.5 43.1,51.8 17.3,51.9 16.2,53 12.3,53.2 5.4,53.7 19.9,53.9 42.9,54.1 15.7,54.2 13,54.5 11.5,54.6 14.4,54.6 22.6,54.8 19.2,55.1 44.3,55.2 46.1,55.6 5.8,55.7 33.3,55.9 31.7,56 18.1,56.3 45.5,56.6 5.4,57.3 46.2,57.5 12.9,58.1 10.1,58.2 31.5,58.3 33,58.3 5.4,59.4 25.1,59.9 27.8,60 5.2,61.5 44.8,62.9 30,63.5 28.2,63.6 38.6,64 5.2,64.2 36.9,64.3 44.6,64.5 46.5,64.7 17.2,65.1 35.1,65.4 5.3,66.1 13.7,66.1 7.3,66.6 34.1,66.6 36.8,66.9 20.5,68.2 46.3,68.7 9.4,68.8 46.6,70.4 23.2,70.5 39.5,71 6.6,71.7 9,71.9 47,72.7 13.7,72.9 45.9,73.1 11.9,73.2 5.4,73.3 8.4,73.3 15.5,73.9 28.3,74.1 18.6,74.2 39,74.7 23.5,75 5.2,75.4 12.6,75.8 32.8,76.7 19.7,77.8 33.8,77.8 45.8,77.9 47.6,77.9 48.9,78.5 5.5,78.6 11.8,78.9 46.3,79.3 33.1,79.4 27.2,79.5 28.3,79.5 29.3,79.5 30.3,79.5 31.4,79.5 12.7,79.9 48.5,80 34.4,80.3 37.7,81.1 32.1,81.5 33.4,81.6 49.3,82.1 5.3,82.4 12.8,83.8 34.9,84 25.6,84.3 27.4,84.7 30.3,84.7 19.4,85 45.3,85.3 14.2,85.5 19.1,86.3 3.9,86.4 29.9,86.4 5.3,87.2 18.9,87.7 31,87.9 41.9,88.5 7.4,89.2 36,89.5 4.7,90 34.4,90.6 25.6,90.7 31.2,90.7 21.6,90.8 9.2,90.9 13.1,91.6 8.9,95 20.6,95 26.7,95.1 34.7,95.1 38.7,95.1
  other v2: 18.4,2.6 31.8,2.6 3.4,13.4 3,15.4 48.6,15.5 44.7,47.8 31.8,62.2 28.5,65.4 28.8,67 45.1,67.8 18,68 16.7,69 5.4,70.1 2.6,90.6 17.1,94.9
Green: LED1.21 TR2-5.2 | length 20.5
  Top Layer w0.7: LED1.21 25.9,53.3 27.1,54.5 36.8,54.5 37.3,55 37.3,57.4 39.6,59.7 TR2-5.2
Green0: PWM1.11 R2-5.2 | length 3.8
  Top Layer w0.3: PWM1.11 21.967,27 R2-5.2
Green1: OA1-2.3 R1-11.2 R2-5.1 | length 93.2
  Top Layer w0.3: R2-5.1 25.5,26.867 ; v1(26,25.7) 26,26.467 25.6,26.867 R1-11.2 ; v1@34.1,25 v1(34,25) 34,26.4 35.6,28 38.7,28 42.1,31.4 42.1,34.8 43,35.7 v1(43,35.9) ; OA1-2.3 35.205,76.005 35.2,76 34.7,76.5 34.7,79.2 35.8,80.3 42.9,80.3 v1(44,79.2)
  Bottom Layer w0.3: v1(26,25.7) 32.8,25.7 33.5,25 v1(34,25) ; v1(43,35.9) 43,36.8 48.8,42.6 48.8,73.9 47.1,75.6 46.3,75.6 44,77.9 v1(44,79.2)
Lime1: LED1.20 TR2-4.2 | length 15
  Top Layer w0.7: LED1.20 26.9,52.4 27.7,53.2 37.9,53.2 38.4,52.7 40.15,52.7 TR2-4.2
Lime2: LED1.17 TR2-3.2 | length 22.1
  Top Layer w0.7: LED1.17 33.3,49 37.5,44.8 37.5,42.7 39.1,41.1 43.3,41.1 44.3,40.1 TR2-3.2
Lime10: PWM1.19 R2-2.2 | length 12.6
  Top Layer w0.3: PWM1.19 13.35,26.35 v1@13.8,25.9 ; v1(21.4,22.2) 22.3,22.2 R2-2.2
  Bottom Layer w0.3: v1(13.9,25.6) 13.536,25.236 13.536,24.464 15.8,22.2 v1(21.4,22.2)
Lime11: OA1-1.12 R1-8.2 R2-2.1 | length 45.5
  Top Layer w0.3: OA1-1.12 7.395,46.795 v1(7.4,46.8) ; R2-2.1 24.4,22.3 24.9,21.8 v1(25.6,21.8) 27.067,21.8 R1-8.2
  Bottom Layer w0.3: v1(7.4,46.8) 7.2,46.8 5.3,44.9 5.3,34.7 7.8,32.2 10.9,32.2 18.1,25 24.5,25 25.9,23.6 25.9,22.1 v1(25.6,21.8)
Lime20: PWM1.17 R2-3.2 | length 13.4
  Top Layer w0.3: PWM1.17 13.35,27.65 14.8,26.2 14.8,24.6 v1(14.7,24.5) ; v1(21.4,23.4) 21.4,23.6 21.6,23.8 R2-3.2
  Bottom Layer w0.3: v1(14.7,24.5) 16.2,23 20.8,23 21.2,23.4 v1(21.4,23.4)
Lime22: OA1-1.10 R1-9.2 R2-3.1 | length 45.2
  Top Layer w0.4: R2-3.1 24.8,23.8 25.5,23.1 ; v1@24.6,23.3 24.7,23.3 25,23.6 25.5,23.1 ; R1-9.2 25.667,22.933 25.5,23.1
  Bottom Layer w0.3: v1(5,49.4) 4.9,49.3 4.7,49.3 4.7,34.2 7.3,31.6 10.6,31.6 17.9,24.3 23.5,24.3 24.6,23.2 v1@24.6,23.3
  other v1: 24.8,23.3
NetC1-2_1: C1-2.1 Reg2.3 | length 4.3
  Top Layer w0.4: C1-2.1 15.9,79 15.9,80.9 16.065,81.065 Reg2.3
NetC4-1_1: C4-1.1 I1-1.1 Reg2.6 | length 5.8
  Top Layer w0.5: C4-1.1@25.735,81.065 C4-1.1@25.8,81
  Top Layer w1: Reg2.6 25.735,81.065 27.965,81.065 I1-1.1@28.7,81.8
NetC4-1_2: C4-1.2 Reg2.7 | length 2.6
  Top Layer w0.6: Reg2.7 23.465,82.5 C4-1.2
NetC4-2_2: C4-2.2 D1-1.2 H4.2 TR1-2.3 | length 12
  Top Layer w0.6: TR1-2.3 38.6,26.5 ; C4-2.2 39.4,25.7 38.6,26.5 ; H4.2 44.4,27.9 D1-1.2 40,27.9 38.6,26.5
  Bottom Layer w0.6: H4.2@45.5,26.8 H4.2
NetC6-1_2: C6-1.2 Reg1.4 | length 1.2
  Top Layer w0.7: C6-1.2@17.05,4.15 Reg1.4
NetC6-2_1: C6-2.1 Reg2.4 | length 1.6
  Top Layer w0.6: Reg2.4 17.705,79.795 18,79.5 C6-2.1
NetC7-1_1: C7-1.1 R6-1.2 R7-1.2 Reg2.2 | length 5.2
  Top Layer w0.6: R7-1.2@15.6,85.7 R6-1.2 C7-1.1 15.665,82.335 Reg2.2
NetH1_1: H1.1 Therm-1.1 | length 5
  Top Layer w1.2: Therm-1.1 9.4,7.7 10.5,8.8 H1.1
NetH3_2: H3.2 TR1-1.3 | length 3.4
  Top Layer w0.7: H3.2 6.4,26.948 TR1-1.3
NetLED2_1: LED2.1 TR2-8.2 | length 35.4
  Top Layer w0.6: LED2.1@27.1,67.6 27.9,68.4 v1(35.6,68.4) ; TR2-8.2 38.75,83 v1(39.4,83) ; v1(39.9,68.4) 44,68.4 45.4,69.8 45.4,72 v1(44.5,72.9)
  Bottom Layer w0.6: v1(35.6,68.4) v1@39.7,68.4 ; v1@39.5,82.9 40.1,82.3 40.1,78 44.5,73.6 v1(44.5,72.9)
NetOA1-1_1: OA1-1.1 TR2-1.1 | length 10
  Top Layer w0.4: OA1-1.1 11.505,43.7 v1(11.7,43.7) ; v1(17,39.5) 17.05,39.5 17.8,38.75 TR2-1.1
  Bottom Layer w0.4: v1(11.7,43.7) 13.1,43.7 17.3,39.5 v1(17,39.5)
NetOA1-1_2: OA1-1.2 R1-15.1 R4-1.2 | length 5.9
  Top Layer w0.4: OA1-1.2 12.875,45.525 14,44.4 14,43.9 ; R4-1.2 13.8,43.7 14,43.9 ; R1-15.1 14.7,43.9 14,43.9
NetOA1-1_6: OA1-1.6 R1-16.1 R4-2.2 | length 5
  Top Layer w0.4: OA1-1.6 14.095,50.605 R1-16.1 R4-2.2
NetOA1-1_7: OA1-1.7 TR2-2.1 | length 30.8
  Top Layer w0.4: OA1-1.7 13.575,51.875 v1(13.9,52.2) ; v1(31.8,40.7) 32,40.5 TR2-2.1
  Bottom Layer w0.4: v1(13.9,52.2) 15,52.2 19.2,48 19.2,42.7 19.7,42.2 30.3,42.2 v1(31.8,40.7)
NetOA1-1_8: OA1-1.8 TR2-3.1 | length 64.5
  Top Layer w0.3: OA1-1.8 4.075,51.875 3.3,51.1 3.3,38.1 5.2,36.2 38.1,36.2 v1(38.6,36.7) ; v1(46.6,36.2) TR2-3.1
  Bottom Layer w0.3: v1(38.6,36.7) 40.5,34.8 45.2,34.8 v1(46.6,36.2)
NetOA1-1_9: OA1-1.9 R1-17.1 R4-3.2 | length 43.2
  Top Layer w0.4: OA1-1.9 7.605,50.605 7.8,50.8 7.8,52.4 9.1,53.7 v1(10.8,53.7) ; R1-17.1 33.6,42.8 v1(34.3,42.1) R4-3.2
  Bottom Layer w0.4: v1(10.8,53.7) 10.8,53.267 10.833,53.233 10.8,53.2 12,52 12.6,52 13.4,51.2 14.9,51.2 18.3,47.8 18.3,42.6 19.4,41.5 21.7,41.5 21.9,41.3 29.8,41.3 31.5,39.6 32.5,39.6 34.3,41.4 v1(34.3,42.1)
NetOA1-1_13: OA1-1.13 R1-18.1 R4-4.2 | length 52.9
  Top Layer w0.4: OA1-1.13 4.825,45.525 4.2,44.9 4.2,43.9 5,43.1 7.6,43.1 10,40.7 v1(10.8,40.7) ; v1(38.1,48) R4-4.2 R1-18.1
  Bottom Layer w0.4: v1(10.8,40.7) 12.2,39.3 13,39.3 16.5,35.8 22.7,35.8 25,38.1 25,38.9 25.8,39.7 28.7,39.7 30.4,38 33.7,38 38.1,42.4 v1(38.1,48)
NetOA1-1_14: OA1-1.14 TR2-4.1 | length 52.7
  Top Layer w0.4: OA1-1.14 8.545,44.255 8.545,43.955 9.6,42.9 10.8,42.9 10.8,42.2 12,41 v1(12.5,41) ; v1(40.1,54.1) 40.1,54.75 TR2-4.1
  Bottom Layer w0.4: v1(12.5,41) 16.9,36.6 22.3,36.6 24,38.3 24,39.1 25.3,40.4 29.3,40.4 31,38.7 33.1,38.7 37.1,42.7 37.1,50.1 40.1,53.1 v1(40.1,54.1)
NetOA1-2_1: OA1-2.1 TR2-5.1 | length 27.2
  Top Layer w0.4: v1(36.5,79.3) 36.5,78.695 OA1-2.1 ; TR2-5.1 37.3,62.1 v1(37.9,62.7)
  Bottom Layer w0.4: v1(36.5,79.3) 36.5,77.2 37.3,76.4 39.2,76.4 42.5,73.1 42.5,64.2 41,62.7 v1(37.9,62.7)
NetOA1-2_2: OA1-2.2 R1-19.1 R4-5.2 | length 26.6
  Top Layer w0.4: OA1-2.2 38.275,77.275 v1(38.3,77.3) ; R4-5.2 41.1,57.2 v1(41.8,57.9) 42.5,57.2 R1-19.1
  Bottom Layer w0.4: v1(38.3,77.3) 39.5,77.3 43.3,73.5 43.3,59.4 v1(41.8,57.9)
NetOA1-2_6: OA1-2.6 R1-20.1 R4-6.2 | length 20.2
  Top Layer w0.4: v1@34.5,72.195 OA1-2.6 ; R4-6.2 R1-20.1 35.5,59.4 v1(35.7,59.4)
  Bottom Layer w0.4: v1(34.7,72.2) 34.7,71.5 32.959,69.759 32.959,65.641 36,62.6 36,59.2 35.9,59.2 v1(35.7,59.4)
NetOA1-2_7: OA1-2.7 TR2-6.1 | length 26.8
  Top Layer w0.4: TR2-6.1 22.8,57.5 v1(22.8,61.4) ; v1(28.9,69.8) 29.4,69.8 30.525,70.925 OA1-2.7
  Bottom Layer w0.4: v1(22.8,61.4) 22.1,61.4 21.1,62.4 21.1,65 25.9,69.8 v1(28.9,69.8)
NetOA1-2_8: OA1-2.8 TR2-7.1 | length 39.7
  Top Layer w0.4: TR2-7.1 8.1,62.5 9.7,64.1 22,64.1 v1(22.3,63.8) ; v1(30.7,69.5) 39.7,69.5 41.125,70.925 OA1-2.8
  Bottom Layer w0.4: v1(22.3,63.8) 22.3,64.6 26,68.3 29.5,68.3 v1(30.7,69.5)
NetOA1-2_9: OA1-2.9 R1-21.1 R4-7.2 | length 45.6
  Top Layer w0.4: R1-21.1 R4-7.2 13.1,55.6 13.3,55.8 13.3,56.7 15.1,58.5 v1(19.3,58.5)
  Bottom Layer w0.4: v1(19.3,58.5) 19.3,64.8 25.2,70.7 30.8,70.7 33.05,72.95 33.05,74.65 33.7,75.3 36.351,75.3 39.451,72.2 v1(40.1,72.2)
NetOA1-2_12: OA1-2.12 PWM1.22 R1-14.2 | length 117.3
  Top Layer w0.3: R1-14.2 8.7,21.9 ; PWM1.22 12.5,24.35 10.25,24.35 8.7,22.8 8.7,21.9 ; v1(15.2,15.1) 13.5,15.1 8.7,19.9 8.7,21.9 ; v1(33.2,15.1) v1(42.1,15.1) ; OA1-2.12 47.205,76.005 v1(47.9,76.7)
  Bottom Layer w0.3: v1(15.2,15.1) v1(33.2,15.1) ; v1(42.1,15.1) 44.1,15.1 49.4,20.4 49.4,75.9 48.6,76.7 v1(47.9,76.7)
NetOA1-2_13: OA1-2.13 R1-22.2 R4-8.2 | length 15.5
  Top Layer w0.3: v1(38.8,78.9) 40.425,77.275 OA1-2.13
  Top Layer w0.6: R4-8.2 v1(33.1,86.8) R1-22.2
  Bottom Layer w0.3: v1(33.1,86.8) 33.1,84.2 38.4,78.9 v1(38.8,78.9)
NetOA1-2_14: OA1-2.14 TR2-8.1 | length 11.5
  Top Layer w0.6: TR2-8.1 36.35,83.1 v1(37.3,83.1) ; OA1-2.14 41.6,78.595 v1(41.6,79.3)
  Bottom Layer w0.6: v1(37.3,83.1) 39,84.8 40.2,84.8 41.6,83.4 v1(41.6,79.3)
NetPWM1_6: PWM1.6 R1-6.2 R5-2.1 | length 23.6
  Top Layer w0.3: PWM1.6 19.25,23.75 19.7,23.3 19.7,19.8 20.7,18.8 32.5,18.8 35.1,21.4 R1-6.2 R5-2.1
NetPWM1_21: PWM1.21 R1-5.2 R5-1.1 | length 4.2
  Top Layer w0.3: R5-1.1 9.5,25.3 R1-5.2 ; R1-5.2@10.55,25.05 PWM1.21
NetR1-4_2: R1-4.2 Reg2.1 | length 1.3
  Top Layer w0.6: R1-4.2@17.4,84.9 17.5,84.8 Reg2.1
NetR1-15_2: R1-15.2 R3-1.2 TR2-1.3 | length 8.4
  Top Layer w0.4: 12.8,38.95 13.525,39.675 13.525,40.425 14.9,41.8 R1-15.2
  Top Layer w0.8: R3-1.2@8.6,39 8.65,38.95 12.8,38.95
NetR1-16_2: R1-16.2 R3-2.2 TR2-2.3 | length 20.4
  Top Layer w0.4: v1(21.4,37.6) 21.4,38.5 R3-2.2 ; v1@14.3,48.4 v1(14.35,48.35) 14.35,48.85 14.4,48.9 R1-16.2 v1@14.3,48.4
  Top Layer w0.8: R3-2.2@23.3,39 23.35,38.95 TR2-2.3@27.4,38.95
  Bottom Layer w0.4: v1@14.7,48.3 14.7,46.5 14.7,44.3 v1(21.4,37.6)
NetR1-17_2: R1-17.2 R3-3.2 TR2-3.3 | length 14
  Top Layer w0.4: R1-17.2 33,44.2 32.3,43.5 32.3,41.9 33.6,40.6 36.3,40.6 R3-3.2
  Top Layer w0.8: R3-3.2 37.95,38.95 TR2-3.3
NetR1-18_2: R1-18.2 R3-4.2 TR2-4.3 | length 9.3
  Top Layer w0.4: R1-18.2 36.7,50.95 37.05,51.3 39.25,51.3 TR2-4.3
  Top Layer w0.8: R3-4.2 40,50.05 TR2-4.3
NetR1-19_2: R1-19.2 R3-5.2 TR2-5.3 | length 8.1
  Top Layer w0.4: R1-19.2 44,57.902 R3-5.2
  Top Layer w0.8: TR2-5.3 42.35,60 R3-5.2
NetR1-20_2: R1-20.2 R3-6.2 TR2-6.3 | length 9.2
  Top Layer w0.4: R3-6.2 R3-6.2 32.6,60 34.1,61.5 R1-20.2
  Top Layer w0.7: TR2-6.3@27.3,57.3 28.798,57.3 R3-6.2
NetR1-21_2: R1-21.2 R3-7.2 TR2-7.3 | length 15.1
  Top Layer w0.4: R1-21.2 9.1,57 9.1,58.8 9.2,58.9 9.2,61.736 10.3,62.836 v1(10.3,63)
  Top Layer w0.8: v1(11.8,60.3) 12.85,60.3 13.15,60 R3-7.2
  Bottom Layer w0.4: v1(10.3,63) 11.8,61.5 v1(11.8,60.3)
NetR1-22_1: R1-22.1 R9-1.2 TR2-8.3 | length 11.2
  Top Layer w0.3: R1-22.1 34.2,85.1 40.8,85.1 TR2-8.3@40.8,83.7
  Top Layer w0.6: TR2-8.3@40.8,83.7 40.95,83.85 R9-1.2
NetR5-1_2: R5-1.2 TR1-1.1 | length 2.4
  Top Layer w0.3: R5-1.2 7.3,24.75 TR1-1.1
NetR5-2_2: R5-2.2 TR1-2.1 | length 0.8
  Top Layer w0.3: R5-2.2@36.5,23.1 TR1-2.1@36.5,23.85
Overflow: H6.5 R2-8.2 Reg1.3 | length 147.3
  Top Layer w0.3: R2-8.2@15.2,6.6 11.5,6.6 10.8,5.9 6.023,5.9 0.7,11.223 0.7,86.1 2.9,88.3 5.2,88.3 10.5,93.6 41.7,93.6 43.5,91.8 44.4,91.8 45,91.2 46.8,91.2 47.617,90.383 47.617,88.88 47.62,88.867 H6.5
  Top Layer w0.5: R2-8.2@15.2,6.6 16.4,7.8 Reg1.3@16.75,7.8
Red: LED1.24 TR2-7.2 | length 23
  Top Layer w0.7: TR2-7.2 10.4,61.2 12.2,63 18.3,63 20.6,60.7 20.6,54.9 22.9,52.6 LED1.24
Red0: PWM1.12 R2-6.2 | length 4
  Top Layer w0.3: PWM1.12 20.85,27.65 21.533,28.333 R2-6.2 R2-6.2@22.067,28.3
Red1: OA1-2.10 R1-12.2 R2-6.1 | length 72.8
  Top Layer w0.3: v1(36.4,29.2) 39,29.2 41.3,31.5 41.3,36 v1(41.6,36.3)
  Top Layer w0.4: R2-6.1 25.833,28.333 ; v1(26.3,28.8) 25.833,28.333 ; R1-12.2 25.833,28.333 ; OA1-2.10 43.265,73.465 44,74.2 v1(47.1,74.2)
  Bottom Layer w0.3: v1(41.6,36.3) 41.5,36.3 41.4,36.4 48.2,43.2 48.2,73.2 47.2,74.2 v1(47.1,74.2)
  Bottom Layer w0.4: v1(26.3,28.8) 26.4,28.9 36.1,28.9 v1(36.4,29.2)
SCL: H2.2 H5.2 H6.6 H7.5 PWM1.26 | length 187
  Top Layer w0.3: v1(2.5,85.3) 2.5,85.1 4.1,83.5 7.5,83.5 H7.5 ; v1(11,21.5) 11,21.7 10.9,21.8 PWM1.26
  Top Layer w0.4: H7.5 9,83 13.1,87.1 13.1,89.8 15.2,91.9 41.1,91.9 43.1,89.9 H6.6 ; v1(26.107,9.2) 26.307,9 39.4,9 v1(39.7,8.7)
  Bottom Layer w0.3: v1(2.5,85.3) 1.3,84.1 1.3,30.531 0.8,30.031 0.8,25.15 4.15,21.8 7.7,21.8 ; v1(11,21.5) 10.8,21.5 10.6,21.7 10.7,21.8 7.7,21.8 ; v1(26.107,9.2) 26.107,9.544 25.451,10.2 22.7,10.2 17.9,5.4 7,5.4 5.1,7.3 5.1,12.9 7.7,15.5 7.7,21.8
  Bottom Layer w0.4: v1(26.107,9.2) 26.107,8.407 26.1,8.4 27.25,7.25 H2.2 ; v1(39.7,8.7) 40.05,8.35 H5.2@40.05,5.4
SDA: H2.1 H5.1 H6.4 H7.4 PWM1.27 | length 169
  Top Layer w0.3: H7.4 3.2,81.5 2.2,80.5 2.2,32.6 5.1,29.7 14.3,29.7 15.6,28.4 15.6,19.1 20.1,14.6 29.8,14.6 30.5,13.9 v1(30.5,12) ; PWM1.27 15.5,21.15
  Top Layer w0.4: v1(28.9,7.2) 29.2,6.9 v1(41.2,6.9)
  Bottom Layer w0.4: H7.4 18.8,81.5 21.9,84.6 21.9,89 24.6,91.7 41,91.7 H6.4 ; H2.1 27.9,6 28.9,7 28.9,9.8 30.5,11.4 v1(30.5,12) ; H5.1@40.7,5.6 41,5.9 41,6.7 v1(41.2,6.9)
Yellow: LED1.15 TR2-2.2 | length 12.7
  Top Layer w0.7: LED1.15 31,47 32.5,45.5 32.5,45.2 31.4,44.1 31.4,42.5 30.1,41.2 30.1,39.25 TR2-2.2
Yellow0: PWM1.15 R2-7.2 | length 19.9
  Top Layer w0.3: v1(11.2,28.7) 11.2,28.9 11.15,28.95 PWM1.15 ; v1(16.6,24.3) 16.6,29.2 17.7,30.3 21.7,30.3 R2-7.2
  Bottom Layer w0.3: v1(11.2,28.7) 12.4,27.5 13.4,27.5 v1(16.6,24.3)
Yellow1: OA1-1.5 R1-13.2 R2-7.1 | length 40.6
  Top Layer w0.4: v1(6.2,37.4) 6.5,37.1 v1(11.9,37.1) ; v1(9.4,49.2) 9.4,49.1 9.45,49.15 9.635,49.335 OA1-1.5 ; R2-7.1 27.3,29.9 R1-13.2
  Bottom Layer w0.4: v1(6.2,37.4) 6,37.6 6,43.8 8.4,46.2 8.4,47.4 9.4,48.4 v1(9.4,49.2) v1@9.3,49.3 ; v1(11.9,37.1) 11.9,37 18.9,30 v1(24.6,30)
pads on no net: H2.0 H2.0_1 H2.0_2 H2.4 H3.0 H4.0 H5.0 H5.0_1 H5.0_2 H5.4 H7.0 LED1.1 LED1.4 LED1.7 LED1.10 LED1.12 LED1.13 LED1.16 LED1.18 LED1.19 LED1.22 LED1.25 LED1.25_1 LED2.3 PWM1.8 PWM1.9 PWM1.13 PWM1.16 PWM1.18 PWM1.20 TR2-1.4 TR2-2.4 TR2-3.4 TR2-4.4 TR2-5.4 TR2-6.4 TR2-7.4 TR2-8.4
copper on no net:
  other v1: 24.9,46.2 23.9,47 25.9,47 24.9,47.1 23.1,48 24,48 24.9,48 25.8,48 26.7,48 24.9,48.9 23.9,49.1 25.9,49.1 24.9,49.8

## Polygon pours and split planes (outlines as drawn)
GND on Bottom Layer "GNDPlane" (solid, remove dead copper, pour order 8): 0,111 51.2,111 51.2,-4 0,-4
no net on Bottom Layer "V5B" (solid, remove dead copper, pour order 0): 38.3,6.5 35.2,6.5 35.2,4.3 35.3,4.2 38.3,4.2
GND on Top Layer "GNDPlane" (solid, remove dead copper, pour order 6): 0,111 51.2,111 51.2,-4 0,-4

## Other copper
Top Layer:
  rectangle: 24.2,65.4 25.6,70.6
Bottom Layer:
  rectangle: 19.9,43 30,53

## Silkscreen, mask and mechanical layers (free items; w line width, h text height)
Top Overlay:
  circle w0.254: c24.9,48 r8.05
  text "SCL" at 44.4,89.4 h0.5 r90
  text "OF" at 50.1,87.8 h0.5 r90
  text "SDA" at 44.5,86.2 h0.5 r90
  text "3.3V" at 50.1,84.6 h0.5 r90
  text "GND" at 44.5,84.4 h0.5 r90
  text "12V" at 50.1,81.9 h0.5 r90
  text "-" at 45.4,21.6 h0.8
  text "+" at 47.6,21.6 h0.8
  text "+" at 1.7,21.5 h0.8
  text "-" at 3.8,21.5 h0.8
Bottom Overlay:
  drawing of 10 lines, arcs and shapes, not listed
  text "SCL" at 6,82.4 h0.5 r90
  text "SDA" at 11.9,80.9 h0.5 r90
  text "3.3V" at 6.1,79.1 h0.5 r90
  text "GND" at 11.9,77.6 h0.5 r90
  text "12V" at 6.1,76.4 h0.5 r90
  text "V1.6" at 28.8,37.5 h2
  text "LED Version 2" at 34.4,35.2 h1.52
  text "Harrison Steel" at 37.6,31.6 h2
  text "Device ID:" at 39.8,28.7 h1.52
  text "Power / (12V 3A)" at 16.6,13.4 h1.52
  text "Control" at 31.4,8.3 h1.52
  text "Pump" at 42.4,8.3 h1.52
Top Solder:
  rectangle: 23.8,65.55 26,69.1
Mechanical 1:
  the board outline again, w0.1
Mechanical 13:
  rectangle: 0.6,13 50.6,17
  rectangle: 4.9,0 44.9,10

## Text inside footprints (layer, text, board x,y; h text height)
PWM1: Top Overlay "1" at 16.65,21.1 h0.5 r180